# Altium PCB joemain.PcbDoc
Units mil, origin at the board's own origin, x right, y up, seen from the top; angles counter-clockwise.
Board outline 6000 x 4000 mil, 2 copper layers (Top Layer, Bottom Layer); 83 components, 64 nets, 300 pads, 11 vias.
Unrouted connection lines stored in the file: 163.
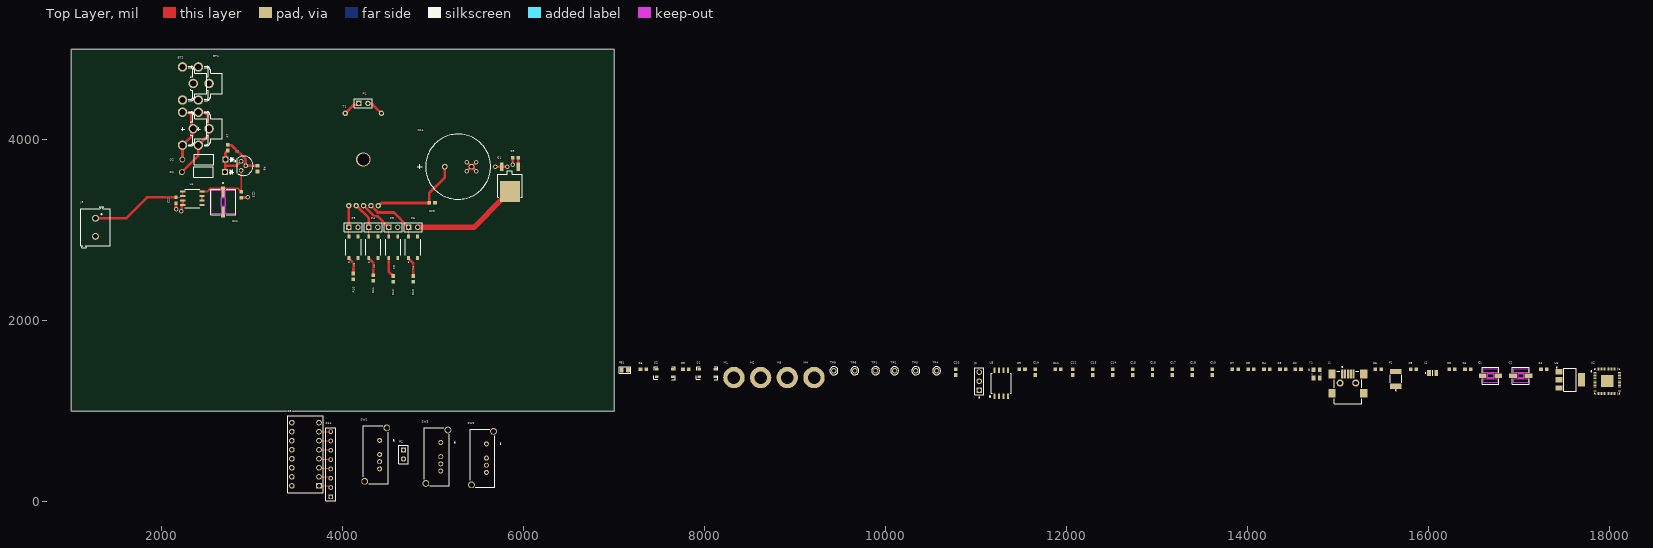
[diagram p0: Top Layer view]
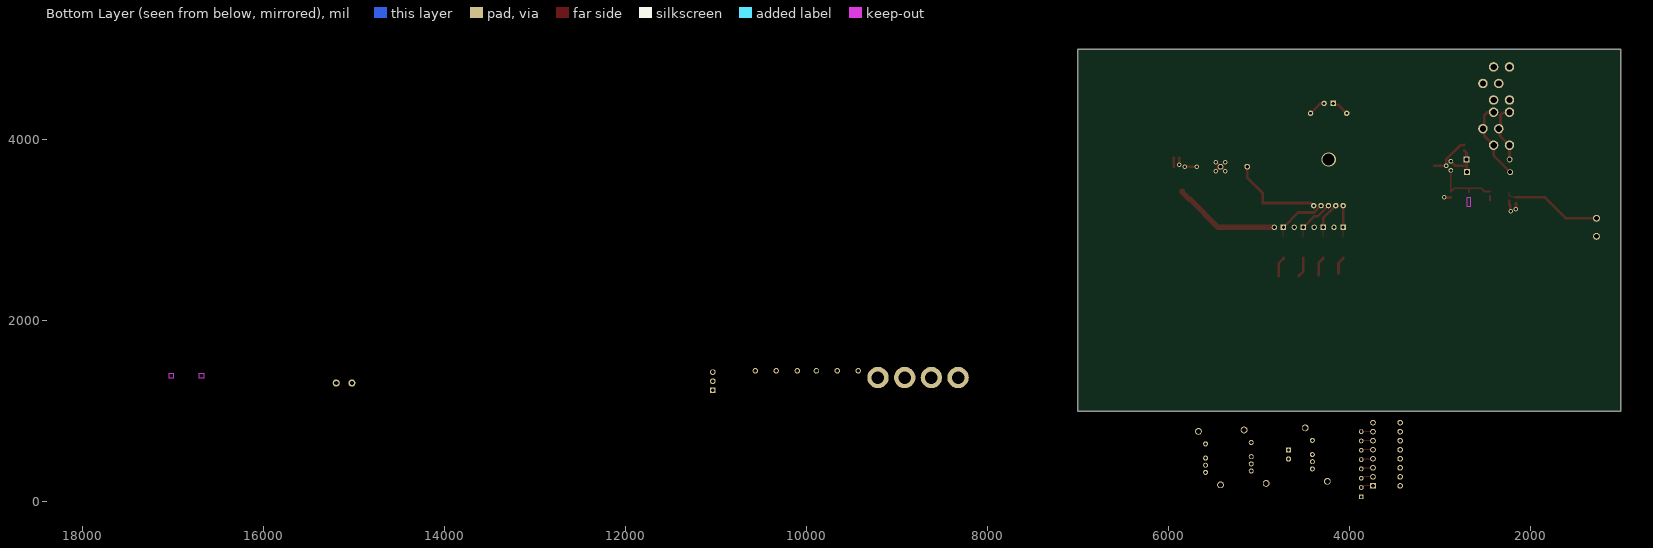
[diagram p1: Bottom Layer view, seen from below]

## Layer stack, top to bottom
Top Solder: solder mask 0.4, Solder Resist, Dk 3.5
Top Layer: signal copper 1.4
Dielectric 1: dielectric 12.6, FR-4, Dk 4.8
Bottom Layer: signal copper 1.4
Bottom Solder: solder mask 0.4, Solder Resist, Dk 3.5

## Board outline
1000,1000 7000,1000 7000,5000 1000,5000

## Design rules (kind name [scope] priority, off if disabled: settings)
Clearance [All] p1: gap=10 ignorepadtopadclearanceinfootprint=FALSE
DiffPairsRouting [All] p1: maxlimit=10 minlimit=10 mostfreqgap=10 toplayer_minwidth=15 toplayer_maxwidth=15 toplayer_prefwidth=15 bottomlayer_minwidth=15 bottomlayer_maxwidth=15 bottomlayer_prefwidth=15 maxuncoupledlength=500
PolygonConnect [All] p1: connectstyle=Relief reliefconductorwidth=10 reliefentries=4 polygonreliefangle="90 Angle" airgapwidth=10
RoutingVias [All] p1: holewidth=28 width=50 viastyle="Through Hole" minholewidth=28 minwidth=50 maxholewidth=28 maxwidth=50
SolderMaskExpansion [All] p1: expansion=4 istentingtop=FALSE
SupplyNets "Schematic Supply Nets_6" [InNet('3V3')] p1: voltage=0.000
SupplyNets "Schematic Supply Nets_5" [InNet('EARTH')] p2: voltage=0.000
SupplyNets "Schematic Supply Nets_4" [InNet('1V1')] p3: voltage=0.000
SupplyNets "Schematic Supply Nets_3" [InNet('5V')] p4: voltage=0.000
SupplyNets "Schematic Supply Nets_2" [InNet('3.3V')] p5: voltage=0.000
SupplyNets "Schematic Supply Nets_1" [InNet('9V')] p6: voltage=0.000
SupplyNets "Schematic Supply Nets" [InNet('GND')] p7: voltage=0.000
Width [All] p1: maxlimit=100 minlimit=10 preferedwidth=10 minimp=50.000000 maximp=50.000000 favimp=50.000000
29 further rules are at their usual default settings.

## Classes and differential pairs
component class waveform-output: BT1 BT2 C21 C22 C23 C24 C25 D1 D2 J3 K1 K2 K3 K4 P1 P2 P3 P4 P5 P6 Q1 R7 R8 R9 R10 R11 R12 R13 R14 S3 SW1 SW2 SW3 T1 U4 U5
component class rp2350: C1 C2 C3 C4 C5 C6 C7 C8 C9 C10 C11 C12 C13 C14 C15 C16 C17 C18 C19 C20 F1 FB1 J1 J2 L1 M1 M2 M3 M4 R1 R2 R3 R4 R5 R6 S1 S2 TP1 TP2 TP3 TP4 TP5 TP6 U1 U2 U3 Y1
differential pair DX: +DX_P -DX_N
differential pair D: +D_P -D_N

## Components (designator, comment, footprint, x,y, rotation, side; value= is the part's Value field where it differs from the comment)
BT1 "593_594" BAT_593 2525,4120 r90 top
BT2 "593_594" BAT_593 2350,4120 r90 top
C1 "10uF" RADIAL_CAN_CAP_4_X_5.8_SMD 16685,1390 r0 top
C2 "10uF" RADIAL_CAN_CAP_4_X_5.8_SMD 17020,1390 r0 top
C3 "Cap" CAPC0603 16260,1460 r0 top value=4.7uF
C4 "Cap" CAPC0603 16435,1460 r0 top value=4.7uF
C5 "Cap" CAPC0603 15835,1460 r0 top value=4.7uF
C6 "Cap" CAPC0603 15445,1460 r0 top value=100nF
C7 "Cap" CAPC0603 13865,1460 r0 top value=15pF
C8 "Cap" CAPC0603 14040,1460 r0 top value=15pF
C9 "Cap" CAPC0603 11510,1460 r0 top value=100nF
C10 "Cap" CAPC0603 11655,1430 r90 top value=4.7uF
C11 "Cap" CAPC0603 11905,1460 r0 top value=100nF
C12 "Cap" CAPC0603 12070,1430 r90 top value=100nF
C13 "Cap" CAPC0603 12290,1430 r90 top value=100nF
C14 "Cap" CAPC0603 12510,1430 r90 top value=100nF
C15 "Cap" CAPC0603 12730,1430 r90 top value=100nF
C16 "Cap" CAPC0603 12950,1430 r90 top value=100nF
C17 "Cap" CAPC0603 13170,1430 r90 top value=100nF
C18 "Cap" CAPC0603 13390,1430 r90 top value=100nF
C19 "Cap" CAPC0603 13610,1430 r90 top value=100nF
C20 "Cap" CAPC0603 10775,1430 r90 top value=100nF
C21 "100uF" CAP_SMT_RADIAL_W6.6MM_D6.3MM 2680,3310 r270 top
C22 "Tantalum" CAPC0603 2160,3330 r90 top value=10uF
C23 "Cap" CAPC0603 2880,3390 r270 top value=100nF
C24 "6800uF" CAP_TH_RADIAL_W18MM_D7.5MM 5130,3700 r0 top
C25 "Cap" CAPC0603 4990,3300 r0 top value=100nF
D1 "1N4003" CR_1N4005_ONS 2700,3640 r180 top
D2 "1N4003" CR_1N4005_ONS 2705.59,3780 r180 top
F1 "MF-MSMF050-2" FUSM4632X85 15640,1355 r90 top
FB1 "0805" L0805 7120,1455 r0 top
J1 "[USB]Mini-B-USB" SAMTEC_MUSB-05-X-B-SM-A-R-K-TR 15110,1260 r0 top
J2 "[Connector] 1x3-header-2.54mm pitch" 1x3-2.54MM-MALE-HEADER 11035,1330 r90 top
J3 "[Connector] 691213510002" "[CONNECTOR] 5MM_2PORT_SCREW" 1270,3030 r270 top
K1 "AQY282SZ" AQY282SZ 4120,2810 r0 top
K2 "AQY282SZ" AQY282SZ 4340,2810 r0 top
K3 "AQY282SZ" AQY282SZ 4560,2810 r0 top
K4 "AQY282SZ" AQY282SZ 4780,2810 r0 top
L1 "3.3uH" 2016_SMD_Inductor 16045,1420 r0 top
M1 "M3 Mount Hole" 3.5MM-MOUNTING-HOLE 8325,1370 r0 top
M2 "M3 Mount Hole" 3.5MM-MOUNTING-HOLE 8620,1370 r0 top
M3 "M3 Mount Hole" 3.5MM-MOUNTING-HOLE 8915,1370 r0 top
M4 "M3 Mount Hole" 3.5MM-MOUNTING-HOLE 9210,1370 r0 top
P1 "transducer" HDR1X2 4180,4400 r0 top
P2 "water detector" HDR1X2 4673.36,569.85 r270 top
P3 "0.1W" HDR1X2 4070,3030 r0 top
P4 "0.5W" HDR1X2 4290,3030 r0 top
P5 "2W" HDR1X2 4510,3030 r0 top
P6 "5W" HDR1X2 4730,3030 r0 top
Q1 "NMOS" TO-252AA 5850,3490 r180 top
R1 "Res" RES0603 17275,1460 r0 top value=33
R2 "Res" RES0603 14560,1460 r0 top value=27
R3 "Res" RES0603 14390,1460 r0 top value=1k
R4 "Res" RES0603 14215,1460 r0 top value=27
R5 "Res" RES0603 7795,1460 r0 top value=1k
R6 "Res" RES0603 7325,1460 r0 top value=1k
R7 "Res" RES0603 2730,3911.5 r270 top value=10Meg
R8 "Res" RES0603 3060,3678.5 r270 top value=10k
R9 "Res" RES0603 5911.5,3800 r180 top value=1Meg
R10 "Res" RES0603 4120,2488.5 r270 top value=330
R11 "Res" RES0603 4340,2470 r270 top value=330
R12 "Res" RES0603 4560,2461.5 r270 top value=330
R13 "Res" RES0603 4780,2460 r270 top value=330
R14 "4608X-101-105LF" BO_4608X 3870,51.5 r90 top
S1 "[SPST] SMD Pushbutton" "[SPST] SMD Pushbutton" 8030,1420 r0 top
S2 "[SPST] SMD Pushbutton" "[SPST] SMD Pushbutton" 7560,1420 r0 top
S3 "DS01C-254-L-08BE" SW_DS01C-254-L-08BE 3590,522.5 r90 top
SW1 "1825255-8" MHS-133_TEC 4410,676.22 r0 top
SW2 "1825255-8" MHS-133_TEC 5590,637.48 r0 top
SW3 "1825255-8" MHS-133_TEC 5085.35,652.76 r0 top
T1 "multi_tap_transformer" multi_tap_transformer 4230,3780 r180 top
TP1 "TP" TPTH-100mil 9890,1445 r0 top
TP2 "TP" TPTH-100mil 10100,1445 r0 top
TP3 "TP" TPTH-100mil 10335,1445 r0 top
TP4 "TP" TPTH-100mil 10565,1445 r0 top
TP5 "TP" TPTH-100mil 9430,1445 r0 top
TP6 "TP" TPTH-100mil 9660,1445 r0 top
U1 "NCP1117LPST33T3G" SOT230P700X175-4N 17565,1345 r0 top
U2 "[MCU] RP2350" QFN40P700X700X90-61N 17975,1330 r0 top
U3 "W25Q128JVSIQ TR" SOIC-8-W-208MIL-2 11280,1305 r90 top
U4 "LP2951ACDR2G" SOIC8-3.9MM 2340,3350 r0 top
U5 "PMOS" TO-92 2880,3760 r270 top
Y1 "ABM8-272-T3" XTAL_ABM8-272-T3 14765,1410 r0 top

## Footprints (in the part's own frame and the unit in brackets; to place one, negate y for a bottom-side part, rotate by r counter-clockwise, add the part's x,y. Pads: shape width x height; smd on the part's side, far side on the other; paste and mask are expansions set on the pad)
1x3-2.54MM-MALE-HEADER [mm]
  rect 1.605x1.605 hole 1.07: 1(-2.54,0)
  round 1.605 hole 1.07: 2(0,0) 3(2.54,0)
  silkscreen extent -4.66,-1.25 3.81,1.25, body extent -3.81,-1.25 3.81,1.25, height 8.95
3.5MM-MOUNTING-HOLE [mm]
  round 6 hole 3.5: 1(0,0)
2016_SMD_Inductor [mm] "0806 (2016 Metric)"
  rect 1x1.6 smd: 1(-1,0) 2(1,0)
  silkscreen extent -2.1,-0.8 0,0.8, body extent -1,-0.8 1,0.8, height 0.95
"[CONNECTOR] 5MM_2PORT_SCREW" [mm] "5.08 mm pitch 2 port screw terminal / 691213510002"
  round 1.95 hole 1.3: 1(-2.54,0) 2(2.54,0)
  silkscreen extent -5.78,-4.15 5.78,4.15, body extent -5.68,-4.04 5.68,4.06, height 10
"[SPST] SMD Pushbutton" [mm] "PTS815SJM250SMTRLFS"
  rect 1x0.7 smd: 1(-2.25,1.075) 1(2.25,1.075) 2(-2.25,-1.075) 2(2.25,-1.075)
  silkscreen extent -3.02,-1.82 3.02,1.8, body extent -2.25,-1.6 2.25,1.6, height 2.5
AQY282SZ [mm]
  rect 0.8x1.2 smd: 1(-1.27,-3) 2(1.27,-3) 3(1.27,3) 4(-1.27,3)
  silkscreen extent -2.15,-4.25 2.15,2.2, body extent -2.35,-3.4 2.35,3.4, height 1.7
BAT_593 [mm]
  round 2.655 hole 1.77: 1(-4.635,3) 1(0,0) 1(4.635,3) 2(8.065,3) 2(12.7,0) 2(17.335,3)
  silkscreen extent -4.83,-3.75 17.52,3.43, body extent -4.7,-3.56 17.65,3.96, height 14.2
BO_4608X [mil]
  rect 52x52 hole 32 paste-99999 mask+0: 1(0,0)
  round 52 hole 32 paste-99999 mask+0: 2(103,0) 3(206,0) 4(309,0) 5(412,0) 6(515,0) 7(618,0) 8(721,0)
  silkscreen extent -44,-54 764,54, body extent -39,-49 759,49, height 200
CAP_SMT_RADIAL_W6.6MM_D6.3MM [mil]
  rect 126x42 smd paste+0 mask+0: 1(-110.5,0) 2(110.5,0)
  Top Layer keep-out region: -45.5,-23 -45.5,23 45.5,23 45.5,-23
  Top Layer keep-out region: -132,23 -132,132 132,132 132,23
  Top Layer keep-out region: -132,-132 -132,-23 132,-23 132,-132
  Keep-Out Layer region: -45.5,-23 -45.5,23 45.5,23 45.5,-23
  silkscreen extent -220,-139 139,139, body extent -154,-134 154,134, height 317
CAP_TH_RADIAL_W18MM_D7.5MM [mil]
  round 62 hole 42 paste-99999 mask+0: 1(0,0) 2(295.28,0)
  silkscreen extent -302,-359 507,359, body extent -207,-354 503,354, height 1458
CAPC0603 [mm] "Chip Capacitor, 2-Leads, Body 1.60x0.80mm, IPC Medium Density"
  rect 1x0.95 smd: 1(-0.8,0) 2(0.8,0)
  body extent -0.88,-0.48 0.87,0.48, height 0.8
CR_1N4005_ONS [mil]
  rect 64x64 / inner round 60 / far side rect 64x64 hole 44 paste-99999 mask+0: 1(0,0)
  round 64 / inner round 60 / far side round 64 hole 44 paste-99999 mask+0: 2(475.59,0)
  silkscreen extent -97,-58 345,59, body extent -17,-53 493,53, height 107
FUSM4632X85 [mm]
  rect 1.5x3.2 smd: 1(-2.1,0) 2(2.1,0)
  silkscreen extent -3.3,-1.6 1.1,1.6, body extent -2.27,-1.62 2.27,1.62, height 1.1
HDR1X2 [mm] "Connector; Header; 2 Position"
  rect 1.5x1.5 hole 0.9: 1(0,0)
  round 1.5 hole 0.9: 2(2.54,0)
  silkscreen extent -1.27,-1.27 3.81,1.27
L0805 [mil]
  rrect25% 40x55 smd: 1(-35,0) 2(35,0)
  silkscreen extent -65,-35 65,35, body extent -39,-24 39,24, height 43
MHS-133_TEC [mil]
  round 55 / inner round 60 / far side round 55 hole 35 paste-99999 mask+0: 1(0,0) 2(0,-157.48) 3(0,-236.22) 4(0,-314.96)
  round 75 / inner round 60 / far side round 75 hole 55 paste-99999 mask+0: 5(-165.35,-452.76) 6(78.74,137.8)
  silkscreen extent -180,-477 160,163, body extent -175,-475 89,155, height 694
multi_tap_transformer [mil]
  round 60 hole 30: 1(-165,510) 2(-83.75,510) 3(-2.5,510) 4(78.75,510) 5(160,510) 6(-200,-510) 7(200,-510)
QFN40P700X700X90-61N [mm] "RP2350"
  rrect25% 0.81x0.2 smd paste+0 mask+0.102: 1(-3.45,2.8) 2(-3.45,2.4) 3(-3.45,2) 4(-3.45,1.6) 5(-3.45,1.2) 6(-3.45,0.8) 7(-3.45,0.4) 8(-3.45,0) 9(-3.45,-0.4) 10(-3.45,-0.8) 11(-3.45,-1.2) 12(-3.45,-1.6) 13(-3.45,-2) 14(-3.45,-2.4) 15(-3.45,-2.8) 31(3.45,-2.8) 32(3.45,-2.4) 33(3.45,-2) 34(3.45,-1.6) 35(3.45,-1.2) 36(3.45,-0.8) 37(3.45,-0.4) 38(3.45,0) 39(3.45,0.4) 40(3.45,0.8) 41(3.45,1.2) 42(3.45,1.6) 43(3.45,2) 44(3.45,2.4) 45(3.45,2.8)
  rrect25% 0.2x0.81 smd paste+0 mask+0.102: 16(-2.8,-3.45) 17(-2.4,-3.45) 18(-2,-3.45) 19(-1.6,-3.45) 20(-1.2,-3.45) 21(-0.8,-3.45) 22(-0.4,-3.45) 23(0,-3.45) 24(0.4,-3.45) 25(0.8,-3.45) 26(1.2,-3.45) 27(1.6,-3.45) 28(2,-3.45) 29(2.4,-3.45) 30(2.8,-3.45) 46(2.8,3.45) 47(2.4,3.45) 48(2,3.45) 49(1.6,3.45) 50(1.2,3.45) 51(0.8,3.45) 52(0.4,3.45) 53(0,3.45) 54(-0.4,3.45) 55(-0.8,3.45) 56(-1.2,3.45) 57(-1.6,3.45) 58(-2,3.45) 59(-2.4,3.45) 60(-2.8,3.45)
  rect 3.4x3.4 smd paste-0.62 mask+0.102: 61(0,0)
  silkscreen extent -4.56,-3.5 3.5,3.5, body extent -3.55,-3.55 3.55,3.55, height 0.96
RADIAL_CAN_CAP_4_X_5.8_SMD [mil]
  rect 86x45 smd paste+0 mask+0: 1(-85,0) 2(85,0)
  Top Layer keep-out region: -80,35 -80,80 80,80 80,35
  Top Layer keep-out region: -80,-80 -80,-35 80,-35 80,-80
  Top Layer keep-out region: -30,-35 -30,35 30,35 30,-35
  Keep-Out Layer region: -30,-24.5 -30,24.5 30,24.5 30,-24.5
  silkscreen extent -94,-94 94,94, body extent -108,-89 108,89, height 242
RES0603 [mm] "Chip Resistor, 2-Leads, Body 1.60x0.80mm, IPC Medium Density"
  rect 1.05x1 smd: 1(-0.8,0) 2(0.8,0)
  body extent -0.88,-0.48 0.87,0.47, height 0.8
SAMTEC_MUSB-05-X-B-SM-A-R-K-TR [mm]
  rect 0.6x2.5 smd: 1(-1.6,3.83) 2(-0.8,3.83) 3(0,3.83) 4(0.8,3.83) 5(1.6,3.83)
  rect 2x2.5 smd: SH(-4.45,-1.62) SH(-4.45,3.83) SH(4.45,-1.62) SH(4.45,3.83)
  round 2 hole 1.2: SH(-2.2,1.25) SH(2.2,1.25)
  silkscreen extent -3.85,-4.6 3.85,5.85, body extent -5,-4.6 5,4.9, height 4.13
SOIC8-3.9MM [mil]
  rect 59x22 smd paste+0 mask+0: 1(-106.5,75) 2(-106.5,25) 3(-106.5,-25) 4(-106.5,-75) 5(106.5,-75) 6(106.5,-25) 7(106.5,25) 8(106.5,75)
  silkscreen extent -82,-102 82,102, body extent -122,-96 122,96, height 69
SOIC-8-W-208MIL-2 [mil] "208mil x 150mil SOIC-8 package"
  rect 60x21 smd paste+0 mask+0: 1(-143.5,75) 2(-143.5,25) 3(-143.5,-25) 4(-143.5,-75) 5(143.5,-75) 6(143.5,-25) 7(143.5,25) 8(143.5,75)
  silkscreen extent -152,-111 111,132, body extent -159,-106 159,106, height 85
SOT230P700X175-4N [mm]
  rect 2x1.5 smd: 1(-3.15,2.3) 2(-3.15,0) 3(-3.15,-2.3)
  rect 2x3.8 smd: 4(3.15,0)
  silkscreen extent -3.85,-3.25 1.75,3.6, body extent -3.5,-3.25 3.5,3.25, height 1.8
SW_DS01C-254-L-08BE [mm]
  rect 1.58x1.58 / inner round 1.58 / far side rect 1.58x1.58 hole 1: 1A(-8.89,-3.81)
  round 1.58 hole 1: 1B(-8.89,3.81) 2A(-6.35,-3.81) 2B(-6.35,3.81) 3A(-3.81,-3.81) 3B(-3.81,3.81) 4A(-1.27,-3.81) 4B(-1.27,3.81) 5A(1.27,-3.81) 5B(1.27,3.81) 6A(3.81,-3.81) 6B(3.81,3.81) 7A(6.35,-3.81) 7B(6.35,3.81) 8A(8.89,-3.81) 8B(8.89,3.81)
  silkscreen extent -10.87,-5.7 10.87,4.95, body extent -10.87,-4.95 10.87,4.95, height 5.18
TO-92 [mil]
  round 52 hole 32 paste-99999 mask+0: 1(0,0) 2(50,50) 3(100,0)
  silkscreen extent -57,-70 158,132, body extent -52,-17 152,127, height 210
TO-252AA [mil]
  rect 37x98 smd paste+0 mask+0: 1(-90,-209.5) 3(90,-209.5)
  rect 217x233 smd paste+0 mask+0: 2(0,63)
  silkscreen extent -138,-168 138,128, body extent -133,-244 133,166, height 94
TPTH-100mil [mil] "Test Point"
  round 60 hole 40: 1(0,0)
  silkscreen extent -45,-45 45,45, body extent -50,-50 50,50, height 182
XTAL_ABM8-272-T3 [mm]
  rect 1.05x1.3 smd: 1(-0.875,1.15) 2(-0.875,-1.15) 3(0.875,-1.15) 4(0.875,1.15)
  silkscreen extent -2.24,-0.09 1.25,1.25, body extent -1.25,-1.6 1.25,1.6, height 0.7

## Part data
BT1 BT2: "Battery Contact Snap (Negative) 9V Cell PC Pin", Package=None, Availability=Unavailable, MF="Keystone Electronics", MP=593, Price=None
C1 C2: library part EEE-FK1E100R, "10uF electrolytic cap, radial can, SMD", Manufacturer_Name=Panasonic, Copyright="Copyright (C) 2025 Ultra Librarian. All rights reserved.", Manufacturer_Part_Number=EEE-FK1E100R
C3 C4 C5 C6 C7 C8 C9 C10 C11 C12 C13 C14 C15 C16 C17 C18 C19 C20 C23 C25: Supplier Part Number 1=1276-1000-1-ND, Supplier 1=Digi-Key
C21: library part EXV107M025A9HAA, "100 µF 25 V Aluminum Electrolytic Capacitors Radial, Can - SMD 340mOhm @ 100kHz 3000 Hrs @ 105°C", Manufacturer_Name=Kemet, Copyright="Copyright (C) 2026 Ultra Librarian. All rights reserved.", Manufacturer_Part_Number=EXV107M025A9HAA
C22: library part Cap, Supplier Part Number 1=1276-1000-1-ND, Supplier 1=Digi-Key
C24: library part UKL1A682KHD, "6800 µF 10 V Aluminum Electrolytic Capacitors Radial, Can 2000 Hrs @ 85°C", Manufacturer_Name=Nichicon, Copyright="Copyright (C) 2026 Ultra Librarian. All rights reserved.", Digi-Key_Part_Number_1=UKL1A682KHD-ND, Manufacturer_Part_Number=UKL1A682KHD
D1 D2: "Diode 200 V 1A Through Hole DO-41", Manufacturer_Name=onsemi, Copyright="Copyright (C) 2025 Ultra Librarian. All rights reserved.", Manufacturer_Part_Number=1N4003
F1: "[Fuse] Polymeric PTC Resettable Fuse 15V 500 mA Ih Surface Mount 1812 (4532 Metric), Concave", Package="1812 Bourns", Availability="In Stock", Check_prices=https://www.snapeda.com/parts/MF-MSMF050-2/Bourns+-+J.W.+Miller/view-part/?ref=eda, MF=Bourns, MP=MF-MSMF050-2, Price=None, Purchase-URL=https://pricing.snapeda.com/search/part/MF-MSMF050-2/?ref=eda, SnapEDA_Link=https://www.snapeda.com/parts/MF-MSMF050-2/Bourns+-+J.W.+Miller/view-part/?ref=snap
FB1: library part MH2029-300Y, "[Inductor] Ferrite Bead Bourns MH2029-300Y / SMD-FERRITE-BEAD-30R-3A(0805)", Package="0805 Bourns", Check_prices=https://www.snapeda.com/parts/MH2029-300Y/Bourns/view-part/?ref=eda, MF=Bourns, MP=MH2029-300Y, SnapEDA_Link=https://www.snapeda.com/parts/MH2029-300Y/Bourns/view-part/?ref=snap
J1: "USB - mini B USB 2.0 Receptacle Connector 5 Position Surface Mount, Right Angle / MUSB-05-X-B-SM-A-R-K-TR", Package=None, Check_prices=https://www.snapeda.com/parts/MUSB-05-F-B-SM-A-R-K-TR/Samtec/view-part/?ref=eda, MF=Samtec, MP=MUSB-05-F-B-SM-A-R-K-TR, SnapEDA_Link=https://www.snapeda.com/parts/MUSB-05-F-B-SM-A-R-K-TR/Samtec/view-part/?ref=snap
J2: "1x3 2.54mm header", Package=None, Availability="In Stock", Check_prices=https://www.snapeda.com/parts/G800W305018EU/NEC/view-part/?ref=eda, MF="FCI Connectors", MP=G800W305018EU, Price=None, SnapEDA_Link=https://www.snapeda.com/parts/G800W305018EU/NEC/view-part/?ref=snap
J3: "2 Position Wire to Board Terminal Block Horizontal with Board 0.200 (5.08mm) Through Hole", Package=None, Check_prices=https://www.snapeda.com/parts/691213510002/W%25C3%25BCrth+Elektronik+Midcom/view-part/?ref=eda, MF="WÃ¼rth Elektronik", MP=691213510002, SnapEDA_Link=https://www.snapeda.com/parts/691213510002/W%25C3%25BCrth+Elektronik+Midcom/view-part/?ref=snap
K1 K2 K3 K4: "Solid State Relays - PCB Mount 60v 500mA SOP Form A Norm-Open", Manufacturer_Name=Panasonic, Mouser Part Number=769-AQY282SZ, Datasheet Link=https://media.digikey.com/pdf/Data%20Sheets/Panasonic%20Electric%20Works%20PDFs/AQY28_S_Spec.pdf, Geometry.Height=2.3mm, Manufacturer_Part_Number=AQY282SZ, Mouser Price/Stock=https://www.mouser.co.uk/ProductDetail/Panasonic-Industrial-Devices/AQY282SZ?qs=2rFUEsTwVNwY5EkJsHQb1w%3D%3D
L1: library part "INDUCTOR 3.3uH", "Power Inductors - SMD IND 3.3uH used for RP2350 VREG", Manufacturer_Name=ABRACON, Manufacturer_Part_Number=AOTA-B201610S3R3-101-T, Mouser Part Number=815-AB201610S3R3101T, Datasheet Link=https://abracon.com/datasheets/AOTA-B201610S3R3-101-T.pdf, Geometry.Height=1mm, Mouser Price/Stock=https://www.mouser.co.uk/ProductDetail/ABRACON/AOTA-B201610S3R3-101-T?qs=%252BXxaIXUDbq0IZvJW%2F2mv4w%3D%3D
M1 M2 M3 M4: library part "[Mount] M3 Mount Hole", "Place at least 4.5mm from board edge. Plated."
P1 P2 P3 P4 P5 P6: library part "Header 2", "Header, 2-Pin", LatestRevisionDate=17-Jul-2002, LatestRevisionNote="Re-released for DXP Platform.", Publisher="Altium Limited"
Q1: library part RFD14N05LSM, "N-Channel 50 V 14A (Tc) 48W (Tc) Surface Mount TO-252AA", Manufacturer_Name=onsemi, Copyright="Copyright (C) 2025 Ultra Librarian. All rights reserved.", Manufacturer_Part_Number=RFD14N05LSM
R1 R2 R3 R4 R5 R6 R7 R8 R9 R10 R11 R12 R13: "SMD, RES0603", Supplier Part Number 1=RMCF0603JT10K0CT-ND, Supplier 1=Digi-Key
R14: "1M Ohm ±2% 200mW Power Per Element Bussed 7 Resistor Network/Array ±100ppm/°C 8-SIP", Manufacturer_Name="Bourns Electronics", Copyright="Copyright (C) 2026 Ultra Librarian. All rights reserved.", Manufacturer_Part_Number=4608X-101-105LF
S1 S2: "PTS815SJM250SMTRLFS", Supplier Part Number 1=CKN12215-6-ND, Supplier 1=DigiKey
S3: "8 Position, Through Hole, 2.54 mm Pitch, Raised Slide Actuator, Convex Bottom, Long Pin, DIP Switch", Package=None, Check_prices=https://www.snapeda.com/parts/DS01C-254-L-08BE/Same+Sky/view-part/?ref=eda, MF="Same Sky", MP=DS01C-254-L-08BE, SnapEDA_Link=https://www.snapeda.com/parts/DS01C-254-L-08BE/Same+Sky/view-part/?ref=snap
SW1 SW2 SW3: "MHS133G04=SP3T SL SW VERT AU", Manufacturer_Name="TE Connectivity", Copyright="Copyright (C) 2025 Ultra Librarian. All rights reserved.", Manufacturer_Part_Number=1825255-8, RefDes=RefDes, Type="Slide Switches"
TP1 TP2 TP3 TP4 TP5 TP6: "Test Point"
U1: "Linear Voltage Regulator IC Positive Fixed 1 Output 1A SOT-223", Package="SOT-223-4 ON Semiconductor", Check_prices=https://www.snapeda.com/parts/NCP1117LPST33T3G/Onsemi/view-part/?ref=eda, MF="ON Semiconductor", MP=NCP1117LPST33T3G, SnapEDA_Link=https://www.snapeda.com/parts/NCP1117LPST33T3G/Onsemi/view-part/?ref=snap
U2: library part SC1509(13), "RP2350A MCU from Raspberry Pi Pico; QFN 60 7x7,", Package=None, Check_prices=https://www.snapeda.com/parts/SC1509-A4/Raspberry+Pi/view-part/?ref=eda, MF="Raspberry Pi", MP=SC1509-A4, SnapEDA_Link=https://www.snapeda.com/parts/SC1509-A4/Raspberry+Pi/view-part/?ref=snap
U3: "IC FLASH 128MBIT SPI/QUAD 8SOIC", Manufacturer_Name=Winbond, Copyright="Copyright (C) 2025 Ultra Librarian. All rights reserved.", Manufacturer_Part_Number="W25Q128JVSIQ TR", RefDes=RefDes, Type=Type
U4: "Linear Voltage Regulator IC Positive Adjustable (Fixed) 1 Output 100mA 8-SOIC", Manufacturer_Name=onsemi, Copyright="Copyright (C) 2026 Ultra Librarian. All rights reserved.", Manufacturer_Part_Number=LP2951ACDR2G, RefDes=RefDes, Type=Type
U5: library part VP0808L-G, "P-Channel 80 V 280mA (Tj) 1W (Tc) Through Hole TO-92-3", Manufacturer_Name=Microchip, Copyright="Copyright (C) 2026 Ultra Librarian. All rights reserved.", Manufacturer_Part_Number=VP0808L-G, RefDes=RefDes, Type=Type
Y1: "12 MHz Â±30ppm Crystal 10pF 50 Ohms 4-SMD, No Lead", Package="NON-STANDARD-4 Abracon", Check_prices=https://www.snapeda.com/parts/ABM8-272-T3/Abracon/view-part/?ref=eda, MF=ABRACON, MP=ABM8-272-T3, SnapEDA_Link=https://www.snapeda.com/parts/ABM8-272-T3/Abracon/view-part/?ref=snap

## Via types
v1: diameter 50, hole 28, Top Layer to Bottom Layer, 10 vias
v2: diameter 157.48, hole 134, Top Layer to Bottom Layer, 1 vias

## Nets (pads, with @x,y where several pads share a name; then routed paths per layer and width w, separated by ;. In a path a pad name is that pad's centre, name@x,y a point inside that pad or via, vN(x,y) a via of type N, cw(c..) or ccw(c..) an arc to the next point about the centre after c; other vN are vias at no path point)
0.1W: K1.4 P3.1 T1.5 | length 341.9
  Top Layer w10: K1.4 P3.1
  Top Layer w30: P3.1 T1.5
0.5W: K2.4 P4.1 T1.4 | length 399.4
  Top Layer w10: K2.4 P4.1
  Top Layer w30: T1.4 4290,3131.25 P4.1
1V1: C5.1 C9.1 C10.1 C11.1 L1.1 TP3.1 U2.6 U2.23 U2.39 U2.50
2W: K3.4 P5.1 T1.3 | length 478.8
  Top Layer w10: K3.4 P5.1
  Top Layer w30: T1.3 4349.27,3153.23 4386.77,3153.23 P5.1
3.3V: R10.2 R11.2 R12.2 R13.2 S3.1B S3.2B S3.3B S3.4B S3.5B S3.6B S3.7B SW2.2 SW3.2
3V3: C2.1 C3.1 C12.1 C13.1 C14.1 C15.1 C16.1 C17.1 C18.1 C19.1 C20.1 R1.1 TP2.1 U1.2 U1.4 U2.1 U2.11 U2.20 U2.30 U2.38 U2.44 U2.45 U2.49 U2.53 U2.54 U3.8
5V: C1.1 C6.2 C22.2 F1.2 J3.1 TP1.1 U1.3 U4.1 U4.2 | length 1115
  Top Layer w10: C22.2 2201.5,3361.5 2215,3375 U4.2 U4.1
  Top Layer w30: J3.1 1606.07,3130 1837.57,3361.5 C22.2
5W: K4.4 P6.1 T1.2 | length 617.6
  Top Layer w10: K4.4 P6.1
  Top Layer w30: T1.2 4390.52,3193.23 4566.77,3193.23 P6.1
9V: C24.1 C25.1 D1.1 D2.1 R7.2 SW1.4 T1.1 U5.1 | length 1497.9
  Top Layer w30: D1.1 2702.8,3642.8 2702.8,3710 ; R7.2 2730,3879.02 2725.31,3874.33 2724.33,3874.33 2705.59,3855.59 D2.1 2702.8,3777.2 2702.8,3710 ; U5.1 2879.59,3760 2829.59,3710 2702.8,3710 ; T1.1 4403.12,3270 4433.12,3300 C25.1 4958.5,3409.43 5130,3580.93 C24.1
D_N: J1.2 R2.1
D_P: J1.3 R4.1
DX_N: R2.2 U2.51
DX_P: R4.2 U2.52
EARTH: FB1.1 J1.SH M1.1 M2.1 M3.1 M4.1
FB: U4.6 U4.7 | length 50
  Top Layer w20: U4.6 U4.7
FREQ_SEL_1: R14.2 S3.1A | length 137.5
  Top Layer w10: S3.1A 3840.63,172.5 3858.63,154.5 R14.2
FREQ_SEL_2: R14.3 S3.2A | length 136.2
  Top Layer w10: S3.2A 3843.63,272.5 3858.63,257.5 R14.3
FREQ_SEL_3: R14.4 S3.3A | length 135
  Top Layer w10: S3.3A 3746,366.5 3864,366.5 R14.4
FREQ_SEL_4: R14.5 S3.4A | length 133.7
  Top Layer w10: S3.4A 3744.5,468 3865.5,468 R14.5
FREQ_SEL_5: R14.6 S3.5A | length 132.5
  Top Layer w10: S3.5A 3743,569.5 3867,569.5 R14.6
FREQ_SEL_6: R14.7 S3.6A | length 131.2
  Top Layer w10: S3.6A 3741.5,671 3868.5,671 R14.7
FREQ_SEL_7: R14.8 S3.7A | length 130
  Top Layer w10: S3.7A R14.8
GND: BT1.2 BT2.2 C1.2 C2.2 C3.2 C4.2 C5.2 C6.1 C7.2 C8.2 C9.2 C10.2 C11.2 C12.2 C13.2 C14.2 C15.2 C16.2 C17.2 C18.2 C19.2 C20.2 C21.2 C22.1 C23.2 C24.2 C25.2 FB1.2 J1.5 J2.3 J3.2 P2.2 Q1.3 R5.1 R9.2 R14.1 S2.1 SW1.3 TP4.1 U1.1 U2.43 U2.47 U2.61 U3.4 U4.3 U4.4 Y1.2 Y1.4 | length 768.7
  Top Layer w30: v1(2160,3230) C22.1 ; v1(2220,3210) 2223.83,3213.83 2223.83,3271 2227.83,3275 U4.4 U4.3 ; C23.2 2880.75,3359.25 2949.25,3359.25 v1(2950,3360) ; v1(5370,3650) 5372.64,3650 5422.64,3700 5372.64,3750 v1(5370,3750) ; C24.2 C24.2@5427.64,3700 ; v1(5480,3650) 5477.64,3650 C24.2@5427.64,3700 ; v1(5480,3750) 5477.64,3750 C24.2@5427.64,3700 ; v1(5690,3700) 5759.5,3700 Q1.3 5760.5,3700 v1(5820,3700) ; v1(5880,3720) R9.2
MODE_SEL: R8.2 SW1.2
NetBT1_1: BT1.1 D1.2 | length 877.3
  Top Layer w30: D1.2 2406.89,3822.48 2406.89,3937.52 2510.74,4041.37 2510.74,4105.74 2525,4120 2525,4140.17 2510,4155.17 2510,4270 2480.98,4299.02 2410.35,4299.02 BT1.1@2406.89,4302.48
NetBT2_1: BT2.1 D2.2 | length 659.6
  Top Layer w30: D2.2 2230.94,3780.94 2230.94,3936.57 2231.89,3937.52 2335.74,4041.37 2335.74,4105.74 2350,4120 2350,4140.17 2330,4160.17 2330,4270 2303.48,4296.52 2237.85,4296.52 BT2.1@2231.89,4302.48
NetC8_1: C8.1 R3.1 Y1.3
NetF1_1: F1.1 J1.1
NetK1_1: K1.1 R10.1 | length 192.6
  Top Layer w30: K1.1 4070,2684.02 4120,2634.02 R10.1
NetK2_1: K2.1 R11.1 | length 211.1
  Top Layer w30: K2.1 4290,2684.02 4340,2634.02 R11.1
NetK3_1: K3.1 R12.1 | length 219.6
  Top Layer w30: K3.1 4510,2543.98 4560,2493.98 R12.1
NetK4_1: K4.1 R13.1 | length 221.1
  Top Layer w30: K4.1 4730,2684.02 4780,2634.02 R13.1
NetR5_2: R5.2 S1.1
NetR6_1: R6.1 S2.2
NetR7_1: R7.1 R8.1 U5.2 | length 470.2
  Top Layer w30: R7.1 2730,3942.01 2734.69,3937.32 2774.8,3937.32 2931,3781.12 2931,3711 U5.2 R8.1
POWER_SEL: K1.3 K2.3 K3.3 K4.3 P3.2 P4.2 P5.2 P6.2 Q1.2 | length 1189.1
  Top Layer w60: P6.2 5453,3030 5763.5,3340.5 5771.5,3340.5 5850,3419 Q1.2
PULSE_LEN_2MS: SW3.4 U2.32
PULSE_LEN_3MS: SW3.3 U2.33
PULSE_LEN_4MS: SW3.1 U2.34
PWM_WAVEFORM: Q1.1 R9.1 | length 101.7
  Top Layer w30: Q1.1 5941.5,3701 5941.5,3798.5 R9.1
PWR_SEL_0.1W: K1.2 U2.15
PWR_SEL_0.5W: K2.2 U2.16
PWR_SEL_2W: K3.2 U2.17
PWR_SEL_5W: K4.2 U2.18
QSPI_SCLK: U2.56 U3.6
QSPI_SD0: U2.57 U3.5
QSPI_SD1: U2.59 U3.2
QSPI_SD2: U2.58 U3.3
QSPI_SD3: U2.55 U3.7
QSPI_SS: R6.2 TP6.1 U2.60 U3.1
REP_RATE_0.5S: SW2.1 U2.37
REP_RATE_1S: SW2.3 U2.36
REP_RATE_2S: SW2.4 U2.35
RUN: S1.2 TP5.1 U2.26
SWCLK: J2.1 U2.24
SWD: J2.2 U2.25
T+: P1.1 T1.7 | length 195.6
  Top Layer w30: T1.7 4125.47,4385.47 4165.47,4385.47 P1.1
T-: P1.2 T1.6 | length 195.6
  Top Layer w30: P1.2 4285.56,4394.44 4325.56,4394.44 T1.6
VREG_AVDD: C4.1 R1.2 U2.46
VREG_IN: C21.1 C23.1 U4.8 U5.3 | length 746.2
  Top Layer w20: U4.8 2506,3425 2522.86,3441.86 2522.86,3445.14 2539.72,3462 2669,3462 C21.1@2680,3451 ; C21.1 C21.1@2680,3451 ; U5.3 C23.1 2880,3422.48 2840.48,3462 2691,3462 C21.1@2680,3451
VREG_LX: L1.2 U2.48
WATER: P2.1 SW1.1
XIN: C7.1 U2.21 Y1.1
XOUT: R3.2 U2.22
pads on no net: J1.4 S3.8A S3.8B SW1.5 SW1.6 SW2.5 SW2.6 SW3.5 SW3.6 U2.2 U2.3 U2.4 U2.5 U2.7 U2.8 U2.9 U2.10 U2.12 U2.13 U2.14 U2.19 U2.27 U2.28 U2.29 U2.31 U2.40 U2.41 U2.42 U4.5
copper on no net:
  other v2: 4230,3780